# Altium PCB CW341_KintexUSTarget.PcbDoc (part 5 of 7)
Units mil, origin at the board's own origin, x right, y up, seen from the top; angles counter-clockwise.
Board outline 4566.97 x 5485 mil, 6 copper layers (Top Layer, Layer 2 (GND), Layer 3 (sig), Layer 4 (sig), Layer 5 (PWR), Bottom Layer), stack 61.068 mil thick; 157 components, 262 nets, 1869 pads, 1478 vias.
Unrouted connection lines stored in the file: 128.
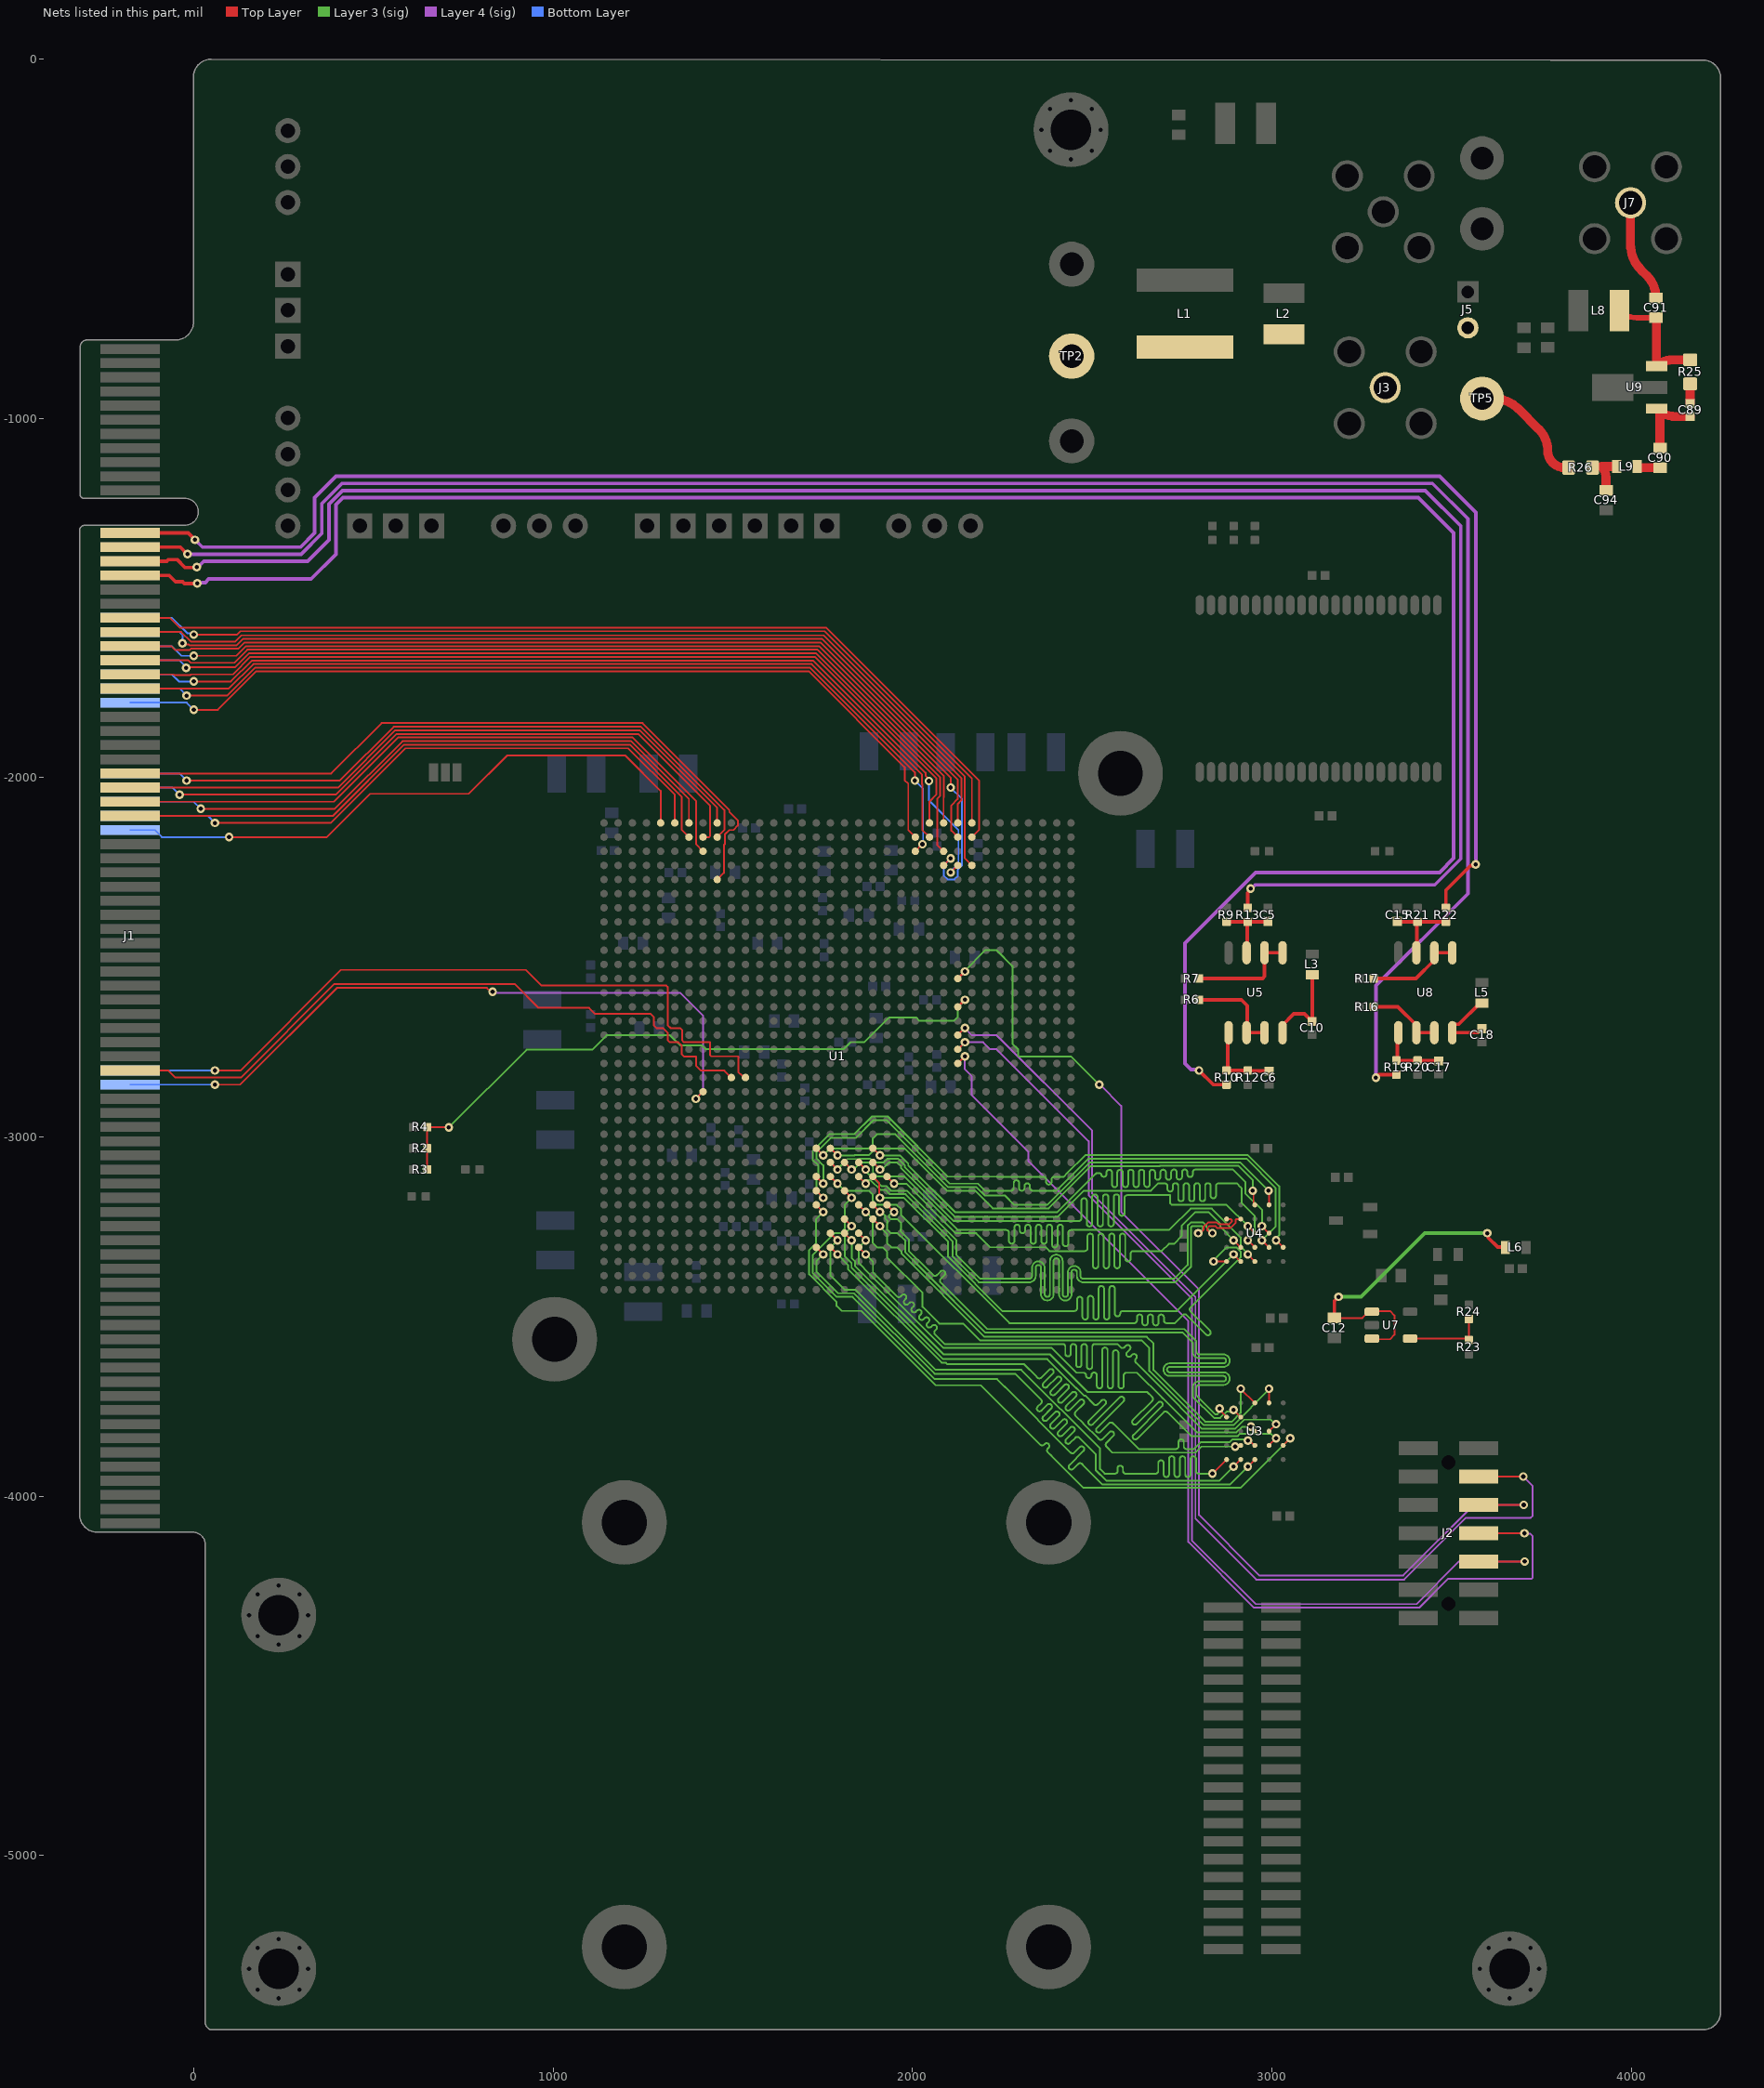
[diagram p8: the nets of this part, all layers, seen from the top]

## Via types
v1: diameter 24, hole 12, Top Layer to Bottom Layer, tented both sides, 1463 vias
v2: diameter 24, hole 10, Top Layer to Bottom Layer, tented both sides, 15 vias

## Nets (pads, with @x,y where several pads share a name; then routed paths per layer and width w, separated by ;. In a path a pad name is that pad's centre, name@x,y a point inside that pad or via, vN(x,y) a via of type N, cw(c..) or ccw(c..) an arc to the next point about the centre after c; other vN are vias at no path point) (continued)
HYPR_1_C\S\: U1.F15 U3.A3 | length 1452
  Top Layer w5: U1.F15@1889.76,-3228.35 v1(1909.45,-3248.03) ; v1(2913.39,-3700.79) U3.A3@2952.76,-3740.16
  Layer 3 (sig) w5: v1(1909.45,-3248.03) 1909.45,-3250.38 1928.95,-3269.88 1928.95,-3295.11 1941.11,-3307.27 1956.9,-3307.27 1969.9,-3320.28 1969.9,-3324.98 2200.93,-3556 2652,-3556 2670.54,-3574.54 2670.54,-3648.46 2814.17,-3792.08 2889.04,-3792.08 2913.39,-3767.73 v1(2913.39,-3700.79)
HYPR_1_DQ0: U1.F17 U3.D3 | length 1915.4
  Top Layer w5: U1.F17@1811.02,-3228.35 v1(1830.71,-3248.03) ; v1(2933.35,-3845.15) 2937.27,-3845.15 2950.38,-3858.27 U3.D3@2952.76,-3858.27
  Layer 3 (sig) w5: v1(1830.71,-3248.03) 1830.71,-3250.38 1811.21,-3269.88 1811.21,-3331.85 1830.58,-3351.22 1830.58,-3363.66 2084.92,-3618 2375.09,-3618 2455.54,-3698.46 2457.31,-3700.22 2477.09,-3720 2481.14,-3720 2504.86,-3743.72 ccw(c2510.16,-3738.41) 2515.47,-3743.72 2525.95,-3733.24 cw(c2531.25,-3738.54) 2536.56,-3733.24 cw(c2531.25,-3738.54) 2536.56,-3743.84 2491.57,-3788.83 ccw(c2496.88,-3794.13) 2491.57,-3799.43 ccw(c2496.88,-3794.13) 2502.18,-3799.43 2576.59,-3725.02 cw(c2581.9,-3730.32) 2587.2,-3725.02 cw(c2581.9,-3730.32) 2587.2,-3735.63 2512.79,-3810.04 ccw(c2518.09,-3815.34) 2512.79,-3820.65 ccw(c2518.09,-3815.34) 2523.39,-3820.65 2547.29,-3796.75 cw(c2552.59,-3802.05) 2557.89,-3796.75 2559.66,-3798.52 2629.67,-3868.52 2730,-3868.52 2732.5,-3868.52 ccw(c2732.5,-3861.02) 2740,-3861.02 2740,-3848.9 cw(c2747.5,-3848.9) 2755,-3848.9 2755,-3861.02 ccw(c2762.5,-3861.02) 2762.5,-3868.52 2777.36,-3868.52 2783.1,-3868.52 2802.1,-3849.53 2882.38,-3849.53 2889.83,-3842.08 2930.28,-3842.08 v1(2933.35,-3845.15)
HYPR_1_DQ1: U1.D18 U3.D2 | length 1910.2
  Top Layer w5: U1.D18@1771.65,-3307.09 v1(1791.34,-3326.77) ; v1(2897.9,-3861.58) 2899.56,-3859.93 2911.73,-3859.93 U3.D2@2913.39,-3858.27
  Layer 3 (sig) w5: v1(1791.34,-3326.77) 1820.58,-3356.01 1820.58,-3367.8 2080.77,-3628 2092.57,-3628 2096.17,-3631.61 2309.61,-3631.61 2346,-3668 2347.77,-3669.77 ccw(c2353.07,-3664.46) 2358.37,-3669.77 2380.24,-3647.9 cw(c2385.54,-3653.2) 2390.85,-3647.9 cw(c2385.54,-3653.2) 2390.85,-3658.51 2364.55,-3684.8 ccw(c2369.86,-3690.11) 2364.55,-3695.41 ccw(c2369.86,-3690.11) 2375.16,-3695.41 2401.45,-3669.11 cw(c2406.76,-3674.42) 2412.06,-3669.11 cw(c2406.76,-3674.42) 2412.06,-3679.72 2385.77,-3706.02 ccw(c2391.07,-3711.32) 2385.77,-3716.62 ccw(c2391.07,-3711.32) 2396.37,-3716.62 2422.67,-3690.33 cw(c2427.97,-3695.63) 2433.27,-3690.33 cw(c2427.97,-3695.63) 2433.27,-3700.93 2406.98,-3727.23 ccw(c2412.28,-3732.53) 2406.98,-3737.84 ccw(c2412.28,-3732.53) 2417.59,-3737.84 2443.88,-3711.54 cw(c2449.18,-3716.84) 2454.49,-3711.54 cw(c2449.18,-3716.84) 2454.49,-3722.15 2428.19,-3748.44 ccw(c2433.5,-3753.75) 2428.19,-3759.05 ccw(c2433.5,-3753.75) 2438.8,-3759.05 2465.1,-3732.74 cw(c2470.41,-3738.05) 2475.71,-3732.74 cw(c2470.41,-3738.05) 2475.71,-3743.35 2453.83,-3765.23 ccw(c2459.14,-3770.53) 2453.83,-3775.83 2475.23,-3797.23 2477,-3799 2516.76,-3838.76 2518.53,-3840.53 ccw(c2523.83,-3835.23) 2529.14,-3840.53 2548.36,-3821.31 cw(c2553.66,-3826.61) 2558.96,-3821.31 cw(c2553.66,-3826.61) 2558.96,-3831.91 2539.74,-3851.14 ccw(c2545.05,-3856.44) 2539.74,-3861.74 2556.52,-3878.52 2606.98,-3878.52 2787.24,-3878.52 2804.18,-3861.58 v1(2897.9,-3861.58)
HYPR_1_DQ2: U1.D16 U3.C4 | length 1916.7
  Top Layer w5: U1.D16@1850.39,-3307.09 v1(1870.08,-3326.77) ; U3.C4@2992.13,-3818.9 v1(3011.81,-3799.21)
  Layer 3 (sig) w5: v1(1870.08,-3326.77) 1889.95,-3346.64 1889.95,-3376.72 1925.63,-3412.4 1927.4,-3414.17 1956.72,-3443.49 ccw(c1962.02,-3438.18) 1967.33,-3443.49 1970.4,-3440.42 cw(c1975.7,-3445.72) 1981,-3440.42 cw(c1975.7,-3445.72) 1981,-3451.02 1977.93,-3454.09 ccw(c1983.23,-3459.4) 1977.93,-3464.7 ccw(c1983.23,-3459.4) 1988.54,-3464.7 1991.61,-3461.63 cw(c1996.91,-3466.93) 2002.22,-3461.63 cw(c1996.91,-3466.93) 2002.22,-3472.24 1999.14,-3475.31 ccw(c2004.45,-3480.61) 1999.14,-3485.91 ccw(c2004.45,-3480.61) 2009.75,-3485.91 2012.82,-3482.84 cw(c2018.13,-3488.15) 2023.43,-3482.84 cw(c2018.13,-3488.15) 2023.43,-3493.45 2020.36,-3496.52 ccw(c2025.66,-3501.82) 2020.36,-3507.13 ccw(c2025.66,-3501.82) 2030.96,-3507.13 2034.04,-3504.06 cw(c2039.34,-3509.36) 2044.64,-3504.06 cw(c2039.34,-3509.36) 2044.64,-3514.66 2041.57,-3517.73 ccw(c2046.87,-3523.04) 2041.57,-3528.34 ccw(c2046.87,-3523.04) 2052.18,-3528.34 2055.25,-3525.27 cw(c2060.55,-3530.57) 2065.86,-3525.27 cw(c2060.55,-3530.57) 2065.86,-3535.88 2062.78,-3538.95 ccw(c2068.09,-3544.25) 2062.78,-3549.55 2073.39,-3560.16 2075.16,-3561.93 2089.23,-3576 2358.84,-3576 2417.78,-3576 cw(c2417.78,-3583.5) 2425.28,-3583.5 2425.28,-3603.16 ccw(c2432.78,-3603.16) 2440.28,-3603.16 2440.28,-3583.5 cw(c2447.78,-3583.5) 2455.28,-3583.5 2455.28,-3633.16 ccw(c2462.78,-3633.16) 2470.28,-3633.16 2470.28,-3583.5 cw(c2477.78,-3583.5) 2485.28,-3583.5 2485.28,-3638.5 ccw(c2492.78,-3638.5) 2500.28,-3638.5 2500.28,-3583.5 cw(c2507.78,-3583.5) 2507.78,-3576 2569.8,-3576 2570.28,-3576.48 2577.4,-3583.6 2579.17,-3585.37 ccw(c2584.47,-3580.06) 2589.78,-3585.37 2593.84,-3581.3 cw(c2599.14,-3586.61) 2604.45,-3581.3 cw(c2599.14,-3586.61) 2604.45,-3591.91 2597.27,-3599.08 ccw(c2602.58,-3604.39) 2597.27,-3609.69 ccw(c2602.58,-3604.39) 2607.88,-3609.69 2611.45,-3606.12 cw(c2616.76,-3611.42) 2622.06,-3606.12 cw(c2616.76,-3611.42) 2622.06,-3616.72 2621.6,-3617.19 ccw(c2626.9,-3622.49) 2621.6,-3627.79 2682.22,-3688.41 2683.99,-3690.18 2805.89,-3812.08 2897.32,-3812.08 2922.75,-3786.66 2996.79,-3786.66 3009.35,-3799.21 v1(3011.81,-3799.21)
HYPR_1_DQ3: U1.E17 U3.D4 | length 1916.7
  Top Layer w5: U1.E17@1811.02,-3267.72 v1(1830.71,-3287.4) ; U3.D4@2992.13,-3858.27 v1(3011.81,-3838.58)
  Layer 3 (sig) w5: v1(1830.71,-3287.4) 1830.71,-3337.2 1840.58,-3347.07 1840.58,-3359.52 2086.06,-3605 2382.09,-3605 2486.8,-3709.72 2522.48,-3709.72 2653.02,-3709.72 2667.03,-3723.72 cw(c2661.73,-3729.03) 2667.03,-3734.33 2613.43,-3787.93 ccw(c2618.73,-3793.23) 2613.43,-3798.54 ccw(c2618.73,-3793.23) 2624.03,-3798.54 2683.41,-3739.16 cw(c2688.72,-3744.46) 2694.02,-3739.16 cw(c2688.72,-3744.46) 2694.02,-3749.76 2614.84,-3828.95 ccw(c2620.14,-3834.25) 2614.84,-3839.55 ccw(c2620.14,-3834.25) 2625.44,-3839.55 2698.85,-3766.15 cw(c2704.15,-3771.45) 2709.46,-3766.15 2751.88,-3808.58 2753.65,-3810.34 2775.39,-3832.08 2905.61,-3832.08 2912.04,-3825.65 2933.63,-3825.65 2997.16,-3825.66 3010.09,-3838.58 v1(3011.81,-3838.58)
HYPR_1_DQ4: U1.G19 U3.D5 | length 1916.7
  Top Layer w5: U1.G19@1732.28,-3188.98 v1(1751.97,-3208.66) ; U3.D5@3031.5,-3858.27 v1(3051.18,-3838.58)
  Layer 3 (sig) w5: v1(1751.97,-3208.66) 1732.1,-3228.53 1732.1,-3255.35 1732.1,-3295.48 1712.47,-3315.11 1712.47,-3382.5 1788.99,-3459.02 1788.99,-3470.11 1802.95,-3484.07 1858.1,-3484.07 2065.03,-3691 2190.09,-3691 2211.54,-3712.46 2213.31,-3714.22 2355.42,-3856.34 ccw(c2360.73,-3851.03) 2366.03,-3856.34 2367.91,-3854.46 cw(c2373.21,-3859.76) 2378.51,-3854.46 cw(c2373.21,-3859.76) 2378.51,-3865.07 2376.64,-3866.94 ccw(c2381.94,-3872.25) 2376.64,-3877.55 2387.24,-3888.16 2389.01,-3889.92 2475.6,-3976.51 2913.26,-3976.51 v1(3051.18,-3838.58)
HYPR_1_DQ5: U1.H17 U3.E3 | length 1915
  Top Layer w5: U1.H17@1811.02,-3149.61 v1(1830.71,-3169.29) ; v1(2933.07,-3917.32) U3.E3@2952.76,-3897.64
  Layer 3 (sig) w5: v1(1830.71,-3169.29) 1811.21,-3188.79 1811.21,-3255.74 1799.05,-3267.9 1783.26,-3267.9 1722.47,-3328.69 1722.47,-3378.36 1789.12,-3445.01 1833.19,-3445.01 2061.99,-3673.82 2235.4,-3673.82 2256.29,-3694.71 2258.06,-3696.48 2439.8,-3878.22 ccw(c2445.11,-3872.92) 2450.41,-3878.22 2465.44,-3863.19 cw(c2470.74,-3868.49) 2476.05,-3863.19 cw(c2470.74,-3868.49) 2476.05,-3873.8 2436.84,-3913 ccw(c2442.14,-3918.31) 2436.84,-3923.61 ccw(c2442.14,-3918.31) 2447.45,-3923.61 2461.01,-3910.04 cw(c2466.32,-3915.34) 2471.62,-3910.04 2473.39,-3911.81 2528.09,-3966.51 2883.89,-3966.51 v1(2933.07,-3917.32)
HYPR_1_DQ6: U1.D19 U3.E2 | length 1916.7
  Top Layer w5: U1.D19@1732.28,-3307.09 v1(1751.97,-3326.77) ; v1(2893.7,-3917.32) U3.E2@2913.39,-3897.64
  Layer 3 (sig) w5: v1(1751.97,-3326.77) 1732.47,-3346.27 1732.47,-3374.22 1793.26,-3435.01 1837.33,-3435.01 2061.57,-3659.25 2286.25,-3659.25 2305,-3678 2306.77,-3679.77 2357.75,-3730.75 cw(c2352.45,-3736.05) 2357.75,-3741.36 2348.3,-3750.81 ccw(c2353.6,-3756.11) 2348.3,-3761.41 ccw(c2353.6,-3756.11) 2358.9,-3761.41 2375.28,-3745.03 cw(c2380.59,-3750.34) 2385.89,-3745.03 cw(c2380.59,-3750.34) 2385.89,-3755.64 2363.93,-3777.6 ccw(c2369.23,-3782.9) 2363.93,-3788.21 ccw(c2369.23,-3782.9) 2374.54,-3788.21 2396.5,-3766.25 cw(c2401.8,-3771.55) 2407.1,-3766.25 cw(c2401.8,-3771.55) 2407.1,-3776.85 2385.14,-3798.81 ccw(c2390.45,-3804.12) 2385.14,-3809.42 ccw(c2390.45,-3804.12) 2395.75,-3809.42 2417.71,-3787.46 cw(c2423.01,-3792.76) 2428.32,-3787.46 cw(c2423.01,-3792.76) 2428.32,-3798.07 2406.36,-3820.03 ccw(c2411.66,-3825.33) 2406.36,-3830.63 ccw(c2411.66,-3825.33) 2416.96,-3830.63 2438.92,-3808.67 cw(c2444.23,-3813.98) 2449.53,-3808.67 cw(c2444.23,-3813.98) 2449.53,-3819.28 2427.57,-3841.24 ccw(c2432.87,-3846.54) 2427.57,-3851.85 ccw(c2432.87,-3846.54) 2438.18,-3851.85 2453.21,-3836.81 cw(c2458.51,-3842.12) 2463.81,-3836.81 2465.58,-3838.58 2509.55,-3882.55 2509.55,-3926.97 2539.09,-3956.51 2854.52,-3956.51 v1(2893.7,-3917.32)
HYPR_1_DQ7: U1.E18 U3.E1 | length 1916.7
  Top Layer w5: U1.E18@1771.65,-3267.72 v1(1791.34,-3287.4) ; v1(2834.65,-3937.01) U3.E1@2874.02,-3897.64
  Layer 3 (sig) w5: v1(1791.34,-3287.4) 1771.84,-3306.9 1771.84,-3386.01 1810.84,-3425.01 1841.47,-3425.01 2064.46,-3648 2303,-3648 2522.09,-3867.09 2522.09,-3924 2535.1,-3937.01 2545,-3937.01 2563.17,-3937.01 ccw(c2563.17,-3929.51) 2570.67,-3929.51 2570.67,-3922.17 cw(c2578.17,-3922.17) 2585.67,-3922.17 2585.67,-3929.51 ccw(c2593.17,-3929.51) 2593.17,-3937.01 2610.67,-3937.01 2617,-3937.01 2676.48,-3937.01 ccw(c2676.48,-3929.51) 2683.98,-3929.51 2683.98,-3907.56 cw(c2691.48,-3907.56) 2698.98,-3907.56 2698.98,-3939.01 ccw(c2706.48,-3939.01) 2713.98,-3939.01 2713.98,-3896.02 cw(c2721.48,-3896.02) 2728.98,-3896.02 2728.98,-3939.01 ccw(c2736.48,-3939.01) 2743.98,-3939.01 2743.98,-3896.02 cw(c2751.48,-3896.02) 2758.98,-3896.02 2758.98,-3939.01 ccw(c2766.48,-3939.01) 2773.98,-3939.01 2773.98,-3896.02 cw(c2781.48,-3896.02) 2788.98,-3896.02 2788.98,-3929.51 ccw(c2796.48,-3929.51) 2796.48,-3937.01 2813.98,-3937.01 v1(2834.65,-3937.01)
HYPR_1_N: U1.G14 U3.B1 | length 1903.3
  Top Layer w5: U1.G14@1929.13,-3188.98 v1(1948.82,-3208.66) ; v1(2854.33,-3755.48) 2854.33,-3759.84 U3.B1@2874.02,-3779.53
  Layer 3 (sig) w5: v1(1948.82,-3208.66) 1944.11,-3208.66 1934.13,-3218.64 1934.13,-3222.78 1939.88,-3228.53 1956.9,-3228.53 1968.32,-3239.95 1968.32,-3256.11 1966.75,-3257.68 1966.75,-3261.82 1989.9,-3284.97 1989.9,-3316.69 2038.38,-3365.17 2040.14,-3366.93 2057.52,-3384.31 ccw(c2062.82,-3379) 2068.12,-3384.31 2078.59,-3373.84 cw(c2083.89,-3379.14) 2089.2,-3373.84 cw(c2083.89,-3379.14) 2089.2,-3384.44 2078.73,-3394.91 ccw(c2084.03,-3400.22) 2078.73,-3405.52 2089.34,-3416.13 2091.1,-3417.89 2207.65,-3534.44 2645.09,-3534.44 2741.16,-3534.44 2756.53,-3534.44 2790.02,-3567.93 2790.02,-3590 2790.02,-3597.5 ccw(c2797.52,-3597.5) 2797.52,-3605 2865.2,-3605 cw(c2865.2,-3622.5) 2865.2,-3640 2715.8,-3640 ccw(c2715.8,-3647.5) 2715.8,-3655 2865.2,-3655 cw(c2865.2,-3672.5) 2865.2,-3690 2797.52,-3690 ccw(c2797.52,-3697.5) 2790.02,-3697.5 2790.02,-3718.75 2794.27,-3723 2843.35,-3772.08 2847.5,-3772.08 2850.7,-3768.88 2850.7,-3759.12 v1(2854.33,-3755.48)
HYPR_1_P: U1.G15 U3.B2 | length 1905.3
  Top Layer w5: U1.G15@1889.76,-3188.98 v1(1909.45,-3208.66) ; v1(2893.7,-3759.84) U3.B2@2913.39,-3779.53
  Layer 3 (sig) w5: v1(1909.45,-3208.66) 1914.15,-3208.66 1924.13,-3218.64 1924.13,-3226.93 1931.17,-3233.96 1931.17,-3238.1 1929.32,-3239.95 1929.32,-3256.11 1940.74,-3267.53 1958.32,-3267.53 1979.9,-3289.12 1979.9,-3320.84 2031.31,-3372.24 2203.51,-3544.44 2677.17,-3544.44 2736.22,-3544.44 2752.39,-3544.44 2780.02,-3572.07 2780.02,-3590 2780.02,-3597.5 ccw(c2797.52,-3597.5) 2797.52,-3615 2865.2,-3615 cw(c2865.2,-3622.5) 2865.2,-3630 2715.8,-3630 ccw(c2715.8,-3647.5) 2715.8,-3665 2865.2,-3665 cw(c2865.2,-3672.5) 2865.2,-3680 2797.52,-3680 ccw(c2797.52,-3697.5) 2780.02,-3697.5 2780.02,-3722.89 2780.13,-3723 2839.21,-3782.08 2856.32,-3782.08 2874.92,-3763.48 2890.07,-3763.48 v1(2893.7,-3759.84)
HYPR_1_R\E\S\E\T\: U1.G16 U3.A4 | length 1587.4
  Top Layer w5: U1.G16@1850.39,-3188.98 v1(1870.08,-3208.66) ; U3.A4@2992.13,-3740.16 v1(2992.13,-3700.79)
  Layer 3 (sig) w5: v1(1870.08,-3208.66) 1889.58,-3228.16 1889.58,-3295.11 1901.56,-3307.09 1917.34,-3307.09 1929.32,-3319.06 1929.32,-3334.85 2027.74,-3433.27 2027.74,-3472.64 2074.37,-3519.27 2141.22,-3519.27 2187.95,-3566 2638,-3566 2658.97,-3586.97 2658.97,-3651.03 2810.03,-3802.08 2893.18,-3802.08 2992.13,-3703.14 v1(2992.13,-3700.79)
HYPR_1_RWDS: U1.E16 U3.C3 | length 1917.1
  Top Layer w5: U1.E16@1850.39,-3267.72 v1(1870.08,-3287.4) ; v1(2941.71,-3806.16) 2941.71,-3807 2952.76,-3818.05 U3.C3@2952.76,-3818.9
  Layer 3 (sig) w5: v1(1870.08,-3287.4) 1850.58,-3306.9 1850.58,-3351.49 1879.95,-3380.86 2086.09,-3587 2387.48,-3587 2456.48,-3656 2475.5,-3656 cw(c2475.5,-3663.5) 2483,-3663.5 2483,-3663.69 ccw(c2490.5,-3663.69) 2498,-3663.69 2498,-3663.18 cw(c2505.5,-3663.18) 2513,-3663.18 2513,-3692.22 ccw(c2520.5,-3692.22) 2528,-3692.22 2528,-3593.5 cw(c2535.5,-3593.5) 2543,-3593.5 2543,-3692.22 ccw(c2550.5,-3692.22) 2558,-3692.22 2558,-3600.84 cw(c2565.5,-3600.84) 2573,-3600.84 2573,-3692.22 ccw(c2580.5,-3692.22) 2588,-3692.22 2588,-3663.5 cw(c2595.5,-3663.5) 2595.5,-3656 2598,-3656 2607.34,-3656 2613,-3656 2625,-3656 2695,-3726 2791.09,-3822.08 2901.46,-3822.08 2917.39,-3806.16 v1(2941.71,-3806.16)
HYPR_2_C\S\: U1.L18 U4.A3 | length 1397.5
  Top Layer w5: U1.L18@1771.65,-3031.5 v1(1791.34,-3051.18) ; v1(2946.81,-3149.61) 2949.1,-3151.89 2949.1,-3182.94 2952.76,-3186.6 U4.A3@2952.76,-3188.98
  Layer 3 (sig) w5: v1(1791.34,-3051.18) 1838.66,-3051.18 1839.27,-3050.57 1877.82,-3050.57 1896.7,-3031.68 1977.43,-3031.68 2095.54,-3149.79 2174.28,-3149.79 2223.28,-3198.79 2379.15,-3198.79 2496.95,-3081 2688.37,-3081 2688.83,-3080.54 2907.6,-3080.54 2943.33,-3116.27 2946.81,-3119.75 v1(2946.81,-3149.61)
HYPR_2_DQ0: U1.K18 U4.D3 | length 1852.8
  Top Layer w5: U1.K18@1771.65,-3070.87 v1(1791.34,-3090.55) ; v1(2933.07,-3287.4) U4.D3@2952.76,-3307.09
  Layer 3 (sig) w5: v1(1791.34,-3090.55) 1791.34,-3089.06 1819.22,-3061.18 1851.05,-3061.18 1851.66,-3060.57 1881.81,-3060.57 1891.93,-3070.68 1920.32,-3070.68 1929.95,-3061.05 1961.04,-3061.05 1978.32,-3078.33 1978.32,-3083.03 2117.45,-3222.16 2404.07,-3222.16 2476.62,-3149.61 2663.87,-3149.61 2684.48,-3129 2701.98,-3129 cw(c2701.98,-3136.5) 2709.48,-3136.5 2709.48,-3144.5 ccw(c2716.98,-3144.5) 2724.48,-3144.5 2724.48,-3135.94 cw(c2731.98,-3135.94) 2739.48,-3135.94 2739.48,-3171.48 ccw(c2746.98,-3171.48) 2754.48,-3171.48 2754.48,-3135.94 cw(c2761.98,-3135.94) 2769.48,-3135.94 2769.48,-3171.48 ccw(c2776.98,-3171.48) 2784.48,-3171.48 2784.48,-3135.94 cw(c2791.98,-3135.94) 2799.48,-3135.94 2799.48,-3171.48 ccw(c2806.98,-3171.48) 2814.48,-3171.48 2814.48,-3135.94 cw(c2821.98,-3135.94) 2829.48,-3135.94 2829.48,-3163.24 ccw(c2836.98,-3163.24) 2844.48,-3163.24 2844.48,-3136.5 cw(c2851.98,-3136.5) 2851.98,-3129 2902.09,-3129 2913.11,-3140.02 2916.09,-3143 2916.09,-3183.5 2952.57,-3219.99 2952.57,-3267.9 v1(2933.07,-3287.4)
HYPR_2_DQ1: U1.J14 U4.D2 | length 1852.9
  Top Layer w5: U1.J14@1929.13,-3110.24 v1(1948.82,-3129.92) ; v1(2893.7,-3287.4) U4.D2@2913.39,-3307.09
  Layer 3 (sig) w5: v1(1948.82,-3129.92) 1982.78,-3129.92 2120.76,-3267.9 2177.33,-3267.9 2216.33,-3306.9 2370.76,-3306.9 2381.26,-3317.4 2477.05,-3317.4 2479.55,-3317.4 ccw(c2479.55,-3309.9) 2487.05,-3309.9 2487.05,-3276.48 cw(c2494.55,-3276.48) 2502.05,-3276.48 2502.05,-3358.01 ccw(c2509.55,-3358.01) 2517.05,-3358.01 2517.05,-3276.48 cw(c2524.55,-3276.48) 2532.05,-3276.48 2532.05,-3358.01 ccw(c2539.55,-3358.01) 2547.05,-3358.01 2547.05,-3276.48 cw(c2554.55,-3276.48) 2562.05,-3276.48 2562.05,-3358.01 ccw(c2569.55,-3358.01) 2577.05,-3358.01 2577.05,-3276.48 cw(c2584.55,-3276.48) 2592.05,-3276.48 2592.05,-3338.89 ccw(c2599.55,-3338.89) 2607.05,-3338.89 2607.05,-3324.9 cw(c2614.55,-3324.9) 2614.55,-3317.4 2667.09,-3317.4 2693.28,-3317.4 2713.37,-3297.31 2727.32,-3297.31 2749.78,-3274.85 2749.78,-3246.45 2787.2,-3209.03 2823.22,-3209.03 2856.64,-3242.45 2856.64,-3250.34 v1(2893.7,-3287.4)
HYPR_2_DQ2: U1.L15 U4.C4 | length 1855.3
  Top Layer w5: U1.L15@1889.76,-3031.5 v1(1909.45,-3051.18) ; v1(2972.44,-3248.03) U4.C4@2992.13,-3267.72
  Layer 3 (sig) w5: v1(1909.45,-3051.18) 1909.58,-3051.05 1965.18,-3051.05 1988.32,-3074.19 1988.32,-3078.89 2118.22,-3208.79 2403.3,-3208.79 2503.77,-3108.32 2510.02,-3102.07 cw(c2516.8,-3112.93) 2525.02,-3103.11 ccw(c2532.52,-3103.11) 2540.02,-3103.11 2540.02,-3098.5 cw(c2547.52,-3098.5) 2555.02,-3098.5 2555.02,-3132.11 ccw(c2562.52,-3132.11) 2570.02,-3132.11 2570.02,-3098.5 cw(c2577.52,-3098.5) 2585.02,-3098.5 2585.02,-3132.11 ccw(c2592.52,-3132.11) 2600.02,-3132.11 2600.02,-3098.5 cw(c2607.52,-3098.5) 2615.02,-3098.5 2615.02,-3132.11 ccw(c2622.52,-3132.11) 2630.02,-3132.11 2630.02,-3098.5 cw(c2637.52,-3098.5) 2645.02,-3098.5 2645.02,-3131.82 ccw(c2652.52,-3131.82) 2660.02,-3131.82 2660.02,-3098.5 cw(c2667.52,-3098.5) 2675.02,-3098.5 2675.02,-3111.5 ccw(c2682.52,-3111.5) 2690.02,-3111.5 2690.02,-3098.36 cw(c2697.52,-3098.36) 2705.02,-3098.36 2705.02,-3111.5 ccw(c2712.52,-3111.5) 2720.02,-3111.5 2720.02,-3098.04 cw(c2727.52,-3098.04) 2735.02,-3098.04 2735.02,-3110.94 ccw(c2742.52,-3110.94) 2750.02,-3110.94 2750.02,-3098.04 cw(c2757.52,-3098.04) 2765.02,-3098.04 2765.02,-3103.96 ccw(c2772.52,-3103.96) 2780.02,-3103.96 2780.02,-3098.04 cw(c2787.52,-3098.04) 2787.52,-3090.54 2891.63,-3090.54 2917.43,-3116.34 2926.09,-3125 2926.09,-3156.46 2972.44,-3202.81 v1(2972.44,-3248.03)
HYPR_2_DQ3: U1.J19 U4.D4 | length 1852.9
  Top Layer w5: U1.J19@1732.28,-3110.24 v1(1751.97,-3129.92) ; v1(2972.44,-3287.4) U4.D4@2992.13,-3307.09
  Layer 3 (sig) w5: v1(1751.97,-3129.92) 1751.97,-3078.76 1732.47,-3059.26 1732.47,-3043.1 1773.63,-3001.94 1842.93,-3001.94 1891.93,-2952.94 1926.97,-2952.94 2103.82,-3129.79 2182.56,-3129.79 2202.19,-3149.42 2271.78,-3149.42 2274.28,-3149.42 ccw(c2274.28,-3141.92) 2281.78,-3141.92 2281.78,-3127.97 cw(c2289.28,-3127.97) 2296.78,-3127.97 2296.78,-3142.29 ccw(c2304.28,-3142.29) 2311.78,-3142.29 2311.78,-3136.45 cw(c2319.28,-3136.45) 2326.78,-3136.45 2326.78,-3141.92 ccw(c2334.28,-3141.92) 2334.28,-3149.42 2371.54,-3149.42 2400.24,-3149.42 2488.66,-3061 2680.09,-3061 2680.55,-3060.54 2929.32,-3060.54 3010.31,-3141.53 3010.31,-3249.53 v1(2972.44,-3287.4)
HYPR_2_DQ4: U1.H19 U4.D5 | length 1855.3
  Top Layer w5: U1.H19@1732.28,-3149.61 v1(1751.97,-3169.29) ; v1(3011.81,-3287.4) U4.D5@3031.5,-3307.09
  Layer 3 (sig) w5: v1(1751.97,-3169.29) 1732.47,-3149.79 1732.47,-3114.25 1737.69,-3109.03 1737.69,-3078.62 1722.47,-3063.4 1722.47,-3038.96 1769.49,-2991.94 1838.79,-2991.94 1887.79,-2942.94 1931.11,-2942.94 2098.59,-3110.42 2234.57,-3110.42 2234.62,-3110.47 2347,-3110.47 2364.5,-3110.47 cw(c2364.5,-3117.97) 2372,-3117.97 2372,-3125.12 ccw(c2379.5,-3125.12) 2387,-3125.12 2387,-3117.97 cw(c2394.5,-3117.97) 2394.5,-3110.47 2411.96,-3110.47 2421.03,-3110.47 2430.85,-3100.65 2480.96,-3050.54 2933.46,-3050.54 3020.31,-3137.39 3020.31,-3273.76 3011.81,-3282.26 v1(3011.81,-3287.4)
HYPR_2_DQ5: U1.K17 U4.E3 | length 1851.9
  Top Layer w5: U1.K17@1811.02,-3070.87 v1(1830.71,-3090.55) ; v1(2933.07,-3326.77) U4.E3@2952.76,-3346.46
  Layer 3 (sig) w5: v1(1830.71,-3090.55) 1835.82,-3090.55 1855.32,-3071.05 1878.16,-3071.05 1889.58,-3082.47 1889.95,-3082.84 1889.95,-3098.63 1901.61,-3110.29 1977.3,-3110.29 2124.91,-3257.9 2214.51,-3257.9 2215.58,-3258.98 2243.63,-3258.98 2261.13,-3258.98 cw(c2261.13,-3266.48) 2268.63,-3266.48 2268.63,-3289.4 ccw(c2276.13,-3289.4) 2283.63,-3289.4 2283.63,-3251.54 cw(c2291.13,-3251.54) 2298.63,-3251.54 2298.63,-3260.4 ccw(c2306.13,-3260.4) 2313.63,-3260.4 2313.63,-3251.54 cw(c2321.13,-3251.54) 2328.63,-3251.54 2328.63,-3289.4 ccw(c2336.13,-3289.4) 2343.63,-3289.4 2343.63,-3251.54 cw(c2351.13,-3251.54) 2358.63,-3251.54 2358.63,-3289.4 ccw(c2366.13,-3289.4) 2373.63,-3289.4 2373.63,-3251.54 cw(c2381.13,-3251.54) 2388.63,-3251.54 2388.63,-3299.9 ccw(c2396.13,-3299.9) 2403.63,-3299.9 2403.63,-3251.54 cw(c2411.13,-3251.54) 2418.63,-3251.54 2418.63,-3296.73 ccw(c2426.13,-3296.73) 2433.63,-3296.73 2433.63,-3266.48 cw(c2441.13,-3266.48) 2441.13,-3258.98 2714.19,-3258.98 2718.64,-3254.53 2774.13,-3199.03 2832.91,-3199.03 2913.2,-3279.32 2913.2,-3304.55 2933.07,-3324.42 v1(2933.07,-3326.77)
HYPR_2_DQ6: U1.J15 U4.E2 | length 1855.3
  Top Layer w5: U1.J15@1889.76,-3110.24 1907.7,-3128.17 1907.7,-3167.54 v1(1909.45,-3169.29) ; v1(2893.7,-3326.77) U4.E2@2913.39,-3346.46
  Layer 3 (sig) w5: v1(1909.45,-3169.29) 1932.33,-3169.29 1932.46,-3169.42 1976.53,-3169.42 2099.02,-3291.92 2099.02,-3333.34 2249.93,-3484.25 2301.09,-3484.25 2448,-3484.25 2450.5,-3484.25 ccw(c2450.5,-3476.75) 2458,-3476.75 2458,-3452.38 cw(c2465.5,-3452.38) 2473,-3452.38 2473,-3500.5 ccw(c2480.5,-3500.5) 2488,-3500.5 2488,-3449.87 cw(c2495.5,-3449.87) 2503,-3449.87 2503,-3500.5 ccw(c2510.5,-3500.5) 2518,-3500.5 2518,-3421.95 cw(c2525.5,-3421.95) 2533,-3421.95 2533,-3500.5 ccw(c2540.5,-3500.5) 2548,-3500.5 2548,-3422.04 cw(c2555.5,-3422.04) 2563,-3422.04 2563,-3491.75 ccw(c2570.5,-3491.75) 2578,-3491.75 cw(c2585.5,-3491.75) 2585.5,-3484.25 2700,-3484.25 2736.22,-3484.25 v1(2893.7,-3326.77)
HYPR_2_DQ7: U1.J18 U4.E1 | length 1855.3
  Top Layer w5: U1.J18@1771.65,-3110.24 v1(1791.34,-3129.92) ; v1(2837.56,-3346.46) U4.E1@2874.02,-3346.46
  Layer 3 (sig) w5: v1(1791.34,-3129.92) 1811.21,-3149.79 1878.16,-3149.79 1889.76,-3161.4 1889.76,-3177.18 1901.37,-3188.79 1956.53,-3188.79 1968.69,-3200.95 1968.69,-3217.15 2269.54,-3518 2599,-3518 2617.11,-3518 ccw(c2617.11,-3510.5) 2624.61,-3510.5 2624.61,-3501.75 cw(c2632.11,-3501.75) 2639.61,-3501.75 2639.61,-3516.94 ccw(c2647.11,-3516.94) 2654.61,-3516.94 2654.61,-3501.75 cw(c2662.11,-3501.75) 2669.61,-3501.75 2669.61,-3516.94 ccw(c2677.11,-3516.94) 2684.61,-3516.94 2684.61,-3501.75 cw(c2692.11,-3501.75) 2699.61,-3501.75 2699.61,-3510.5 ccw(c2707.11,-3510.5) 2707.11,-3518 2724.61,-3518 2730.05,-3518 2740.02,-3508.02 2752.4,-3495.65 cw(c2757.7,-3500.95) 2763.01,-3495.65 2816.97,-3549.61 ccw(c2822.27,-3544.31) 2827.57,-3549.61 ccw(c2822.27,-3544.31) 2827.57,-3539.01 2773.61,-3485.04 cw(c2778.92,-3479.74) 2773.61,-3474.44 2820.52,-3427.52 2868.57,-3379.48 2913.2,-3334.85 2913.2,-3318.69 2901.78,-3307.27 2873.83,-3307.27 2837.56,-3343.54 v1(2837.56,-3346.46)
HYPR_2_N: U1.J16 U4.B1 | length 1832.3
  Top Layer w5: U1.J16@1850.39,-3110.24 v1(1870.08,-3129.92) ; v1(2795.28,-3267.72) 2800.42,-3267.72 2806.42,-3261.71 2807.03,-3261.71 2809.96,-3258.78 2809.96,-3250.5 2822.43,-3238.03 2846.86,-3238.03 2851.57,-3242.74 2881.38,-3242.74 2888.7,-3235.42 2888.7,-3231.28 2885.77,-3228.35 U4.B1@2874.02,-3228.35
  Layer 3 (sig) w5: v1@1872.37,-3120.42 1883.46,-3120.42 1910.15,-3147.11 1924.29,-3147.11 1936.6,-3159.42 1980.67,-3159.42 2089.46,-3268.21 2092.39,-3271.14 2111.73,-3290.48 2111.73,-3331.91 2138.14,-3358.32 2184.28,-3404.45 2317.66,-3404.45 2325.16,-3404.45 ccw(c2325.16,-3386.95) 2342.66,-3386.95 2342.66,-3363.77 cw(c2350.16,-3363.77) 2357.66,-3363.77 2357.66,-3437.38 ccw(c2375.16,-3437.38) 2392.66,-3437.38 2392.66,-3344.9 cw(c2400.16,-3344.9) 2407.66,-3344.9 2407.66,-3437.66 ccw(c2425.16,-3437.66) 2442.66,-3437.66 2442.66,-3376.51 cw(c2450.16,-3376.51) 2457.66,-3376.51 2457.66,-3386.95 ccw(c2475.16,-3386.95) 2475.16,-3404.45 2578.74,-3404.45 2731.74,-3404.45 2775.59,-3360.6 2775.59,-3250.96 2778.52,-3248.03 2804.96,-3248.03 2807.89,-3250.96 2807.89,-3255.1 v1(2795.28,-3267.72)
HYPR_2_P: U1.K16 U4.B2 | length 1864.2
  Top Layer w5: U1.K16@1850.39,-3070.87 v1(1870.08,-3090.55) ; v1@1863.07,-3097.56 v1@1863.22,-3097.7 ; v1(2834.65,-3267.53) 2829.5,-3267.53 2823.68,-3261.71 2822.89,-3261.71 2819.96,-3258.78 2819.96,-3254.64 2826.57,-3248.03 2842.72,-3248.03 2847.43,-3252.74 2885.52,-3252.74 2898.7,-3239.56 2898.7,-3231.28 2901.63,-3228.35 U4.B2@2913.39,-3228.35
  Layer 3 (sig) w5: v1(1870.08,-3090.55) 1870.08,-3095.69 1883.41,-3109.02 1886.2,-3109.02 1914.29,-3137.11 1928.43,-3137.11 1940.74,-3149.42 1984.81,-3149.42 2099.46,-3264.07 2121.73,-3286.34 2121.73,-3327.76 2135.21,-3341.25 2145.21,-3351.25 2188.42,-3394.45 2317.66,-3394.45 2325.16,-3394.45 ccw(c2325.16,-3386.95) 2332.66,-3386.95 2332.66,-3363.77 cw(c2350.16,-3363.77) 2367.66,-3363.77 2367.66,-3437.38 ccw(c2375.16,-3437.38) 2382.66,-3437.38 2382.66,-3344.9 cw(c2400.16,-3344.9) 2417.66,-3344.9 2417.66,-3437.66 ccw(c2425.16,-3437.66) 2432.66,-3437.66 2432.66,-3376.51 cw(c2450.16,-3376.51) 2467.66,-3376.51 2467.66,-3386.95 ccw(c2475.16,-3386.95) 2475.16,-3394.45 2578.74,-3394.45 2727.59,-3394.45 2765.59,-3356.46 2765.59,-3246.82 2774.38,-3238.03 2809.1,-3238.03 2817.89,-3246.82 2817.89,-3250.96 2834.46,-3267.53 v1(2834.65,-3267.53)
HYPR_2_R\E\S\E\T\: U1.L19 U4.A4 | length 1503.3
  Top Layer w5: U1.L19@1732.28,-3031.5 v1(1751.97,-3051.18) ; v1(2990.81,-3149.61) 2992.13,-3150.92 U4.A4@2992.13,-3188.98
  Layer 3 (sig) w5: v1(1751.97,-3051.18) 1771.47,-3031.68 1877.79,-3031.68 1889.58,-3019.89 1889.58,-3004.1 1901.37,-2992.31 1952.2,-2992.31 2099.68,-3139.79 2178.42,-3139.79 2201.39,-3162.76 2257.62,-3162.76 2283.65,-3188.79 2375.01,-3188.79 2492.8,-3071 2684.23,-3071 2684.69,-3070.54 2911.75,-3070.54 2947.48,-3106.27 v1(2990.81,-3149.61)
HYPR_2_RWDS: U1.K15 U4.C3 | length 1855.3
  Top Layer w5: U1.K15@1889.76,-3070.87 v1(1909.45,-3090.55) ; v1(2933.07,-3248.03) U4.C3@2952.76,-3267.72
  Layer 3 (sig) w5: v1(1909.45,-3090.55) 1914.59,-3090.55 1924.46,-3080.68 1934.09,-3071.05 1956.9,-3071.05 1968.32,-3082.47 1968.32,-3087.17 2115.19,-3234.04 2460.05,-3234.04 2462.55,-3234.04 ccw(c2462.55,-3226.54) 2470.05,-3226.54 2470.05,-3177.82 cw(c2477.55,-3177.82) 2485.05,-3177.82 2485.05,-3241.48 ccw(c2492.55,-3241.48) 2500.05,-3241.48 2500.05,-3167.11 cw(c2507.55,-3167.11) 2515.05,-3167.11 2515.05,-3241.48 ccw(c2522.55,-3241.48) 2530.05,-3241.48 2530.05,-3167.11 cw(c2537.55,-3167.11) 2545.05,-3167.11 2545.05,-3241.48 ccw(c2552.55,-3241.48) 2560.05,-3241.48 2560.05,-3167.11 cw(c2567.55,-3167.11) 2575.05,-3167.11 2575.05,-3212.04 ccw(c2582.55,-3212.04) 2590.05,-3212.04 2590.05,-3169.5 cw(c2597.55,-3169.5) 2597.55,-3162 2705,-3162 2717.13,-3162 2717.13,-3184.36 2717.04,-3184.45 2721.57,-3188.98 2874.02,-3188.98 v1(2933.07,-3248.03)
JTAG_TCK: J2.6 U1.AC9 | length 3213.3
  Top Layer w5: J2.6@3575.28,-4023.94 v1(3701.06,-4023.94)
  Top Layer w8: U1.AC9@2125.98,-2559.06 v1(2145.67,-2539.37)
  Layer 4 (sig) w5: v1(2519.69,-2854.33) 2521.77,-2854.33 2580.83,-2913.39 2580.83,-3208.66 2797.36,-3425.2 2797.36,-4052.36 2965,-4220 3365.86,-4220 3561.92,-4023.94 v1(3701.06,-4023.94)
  Layer 3 (sig) w5: v1(2145.67,-2539.37) 2145.67,-2537.02 2202.19,-2480.5 2234.57,-2480.5 2278.4,-2524.32 2278.4,-2739.93 2293.89,-2755.42 2293.89,-2772.66 2296.82,-2775.59 2440.94,-2775.59 v1(2519.69,-2854.33)
JTAG_TDI: J2.10 U1.V9 | length 2893.3
  Top Layer w5: U1.V9@2125.98,-2755.91 v1(2145.67,-2736.22) ; J2.10@3575.28,-4181.42 v1(3703.58,-4181.42)
  Layer 4 (sig) w5: v1(2145.67,-2736.22) 2196.83,-2736.22 2216.33,-2755.72 2234.2,-2755.72 2490.19,-3011.7 2490.19,-3161.83 2777.36,-3449 2777.36,-4122.36 2955,-4300 3402.56,-4300 3521.14,-4181.42 v1(3703.58,-4181.42)
JTAG_TDO: J2.8 U1.U9 | length 2974.6
  Top Layer w5: U1.U9@2125.98,-2795.28 v1(2145.67,-2775.59) ; J2.8@3575.28,-4102.68 v1(3702.68,-4102.68)
  Layer 4 (sig) w5: v1(2145.67,-2775.59) 2145.67,-2811.25 2165.17,-2830.75 2165.17,-2883.67 2323.02,-3041.52 2323.02,-3068.12 2767.36,-3512.47 2767.36,-4127.36 2950,-4310 3410,-4310 3490,-4230 3722.07,-4230 3725,-4227.07 3725,-4110 3718.96,-4103.96 3703.96,-4103.96 v1(3702.68,-4102.68)
JTAG_TMS: J2.4 U1.W9 | length 3025.3
  Top Layer w5: U1.W9@2125.98,-2716.54 v1(2145.67,-2696.85) ; J2.4@3575.28,-3945.2 v1(3699.8,-3945.2)
  Layer 4 (sig) w5: v1(2145.67,-2696.85) 2165.54,-2716.72 2234.57,-2716.72 2500.19,-2982.33 2500.19,-3157.68 2787.36,-3444.86 2787.36,-4062.36 2956.68,-4231.68 3368.32,-4231.68 3540,-4060 3720,-4060 3725,-4055 3725,-3970.39 v1(3699.8,-3945.2)
NetC5_1: C5.1 R9.1 R13.2 U5.3 | length 202.9
  Top Layer w10: R9.1@2874.02,-2401.57 R13.2@2933.07,-2401.57 ; U5.3@2929.72,-2487.2 2931.4,-2485.53 2931.4,-2403.25 R13.2@2933.07,-2401.57 ; C5.1@2989.2,-2400 2988.42,-2400.79 2933.86,-2400.79 R13.2@2933.07,-2401.57
NetC6_1: C6.1 R10.2 R12.1 U5.5 | length 226.4
  Top Layer w10: U5.5@2879.72,-2709.65 2877.12,-2712.25 2877.12,-2811.86 R10.2@2874.02,-2814.96 R12.1@2933.07,-2814.96 2933.86,-2815.75 2991.34,-2815.75 C6.1@2992.13,-2816.54
NetC10_1: C10.1 L3.1 U5.8 | length 255.3
  Top Layer w10: U5.8@3029.72,-2709.65 3029.72,-2688.98 3061.22,-2657.48 3090.94,-2657.48 C10.1@3112.2,-2678.74 L3.1@3112.2,-2548.43
NetC12_1: C12.1 L6.2 U7.1 U7.3 | length 926.5
  Top Layer w5: C12.1@3174.16,-3503.95 3251.91,-3503.95 3269.63,-3486.23 U7.1@3278.49,-3486.23 3280.45,-3484.26 3328.71,-3484.26 3341.29,-3496.85 3341.29,-3550.42 3328.71,-3563 3280.45,-3563 U7.3@3278.49,-3561.03
  Top Layer w10: C12.1@3174.16,-3503.95 3174.16,-3456.7 v1(3185.97,-3444.89) ; v1(3599.35,-3267.73) 3602.03,-3270.41 3602.03,-3280.26 3628.38,-3306.61 3649.64,-3306.61 L6.2@3650.12,-3307.09
  Layer 3 (sig) w10: v1(3185.97,-3444.89) 3248.02,-3444.89 3425.19,-3267.73 v1(3599.35,-3267.73)
NetC15_1: C15.1 R21.1 R22.2 U8.3 | length 222.5
  Top Layer w10: C15.1@3349.38,-2400 3350.17,-2400.79 3404.72,-2400.79 R21.1@3405.51,-2401.57 ; U8.3@3402.16,-2487.2 3403.84,-2485.53 3403.84,-2403.25 R21.1@3405.51,-2401.57 ; R22.2@3484.25,-2401.57 R21.1@3405.51,-2401.57
NetC17_1: C17.1 R19.2 R20.1 U8.5 | length 198.6
  Top Layer w10: U8.5@3352.16,-2709.65 3349.56,-2712.25 3349.56,-2784.01 R19.2@3346.46,-2787.12 R20.1@3405.51,-2787.12 3406.3,-2787.9 3463.78,-2787.9 C17.1@3464.57,-2788.69
NetC18_1: C18.1 L5.1 U8.8 | length 213.7
  Top Layer w10: C18.1@3584.65,-2698.43 3573.42,-2709.65 U8.8@3502.16,-2709.65 3502.16,-2692.66 3508.46,-2686.37 3519.93,-2686.37 3579.13,-2627.17 L5.1@3584.65,-2627.17
NetC89_1: C89.1 C90.2 U9.1 | length 200.6
  Top Layer w25: U9.1@4071,-973 ccw(c4124.11,-919.89) U9.1@4080,-980.68 ; C90.2@4080,-1082.44 U9.1@4080,-980.68 ; C89.1@4164,-995 4124.11,-995 cw(c4124.11,-919.89) U9.1@4080,-980.68
NetC89_2: C89.2 R25.1 | length 54.8
  Top Layer w25: C89.2@4164,-958.78 R25.1@4164,-904
NetC90_1: C90.1 L9.2 | length 64.2
  Top Layer w25: L9.2@4016.74,-1134 ccw(c4025.33,-1125.41) 4025.33,-1137.56 C90.1@4080,-1137.56
NetC91_1: C91.1 L8.1 R25.2 U9.3 | length 340.7
  Top Layer w15: L8.1@3967.09,-700 ccw(c4015.37,-651.72) 4015.37,-720 C91.1@4069,-720
  Top Layer w25: C91.1@4069,-720 4070,-721 4070,-853.89 U9.3@4071,-854.89 cw(c4114.02,-897.91) 4114.02,-837.07 R25.2@4164,-837.07
NetC91_2: C91.2 J7.1 | length 286.2
  Top Layer w25: J7.1@3998,-400 3998,-515.64 ccw(c4098,-515.64) 4027.29,-586.35 4042.96,-602.01 cw(c3980.09,-664.88) C91.2@4069,-664.88
NetC94_1: C94.1 L9.1 R26.2 | length 111.6
  Top Layer w25: C94.1@3930,-1200.44 3930,-1164.36 ccw(c3887.06,-1164.36) 3917.42,-1134 L9.1@3959.26,-1134
NetJ3_1: J3.1 J5.2 L1.1 L2.1 R26.1 TP2.1 TP5.1 | length 340.4
  Top Layer w25: TP5.1@3584.77,-944.88 3616.06,-944.88 cw(c3616.06,-1044.88) 3686.77,-974.17 3742.66,-1030.06 cw(c3682.17,-1090.55) 3767.72,-1090.55 ccw(c3814.17,-1090.55) 3814.17,-1137 R26.1@3825.54,-1137
NetR2_1: R2.1 R3.1 R4.2 U1.AA9 | length 1846.4
  Top Layer w5: R3.1@649.61,-3090.55 R2.1@649.61,-3031.5 R4.2@649.61,-2972.44 708.66,-2972.44 v1(709.84,-2973.62)
  Top Layer w8: U1.AA9@2125.98,-2637.8 v1(2145.67,-2618.11)
  Layer 3 (sig) w5: v1(709.84,-2973.62) 926.4,-2757.05 1108.39,-2757.05 1148.72,-2716.72 1325.56,-2716.72 1354.3,-2745.46 1414.25,-2745.46 1424.51,-2755.72 1484.46,-2755.72 1484.71,-2755.46 1625.52,-2755.46 1625.78,-2755.72 1807.89,-2755.72 1827.26,-2736.35 1865.7,-2736.35 1934.7,-2667.35 2009.85,-2667.35 2019.48,-2676.98 2114.38,-2676.98 2126.17,-2665.19 2126.17,-2639.96 2145.67,-2620.46 v1(2145.67,-2618.11)
NetR6_1: R6.1 U5.6 U5.7 | length 263.2
  Top Layer w10: R6.1@2797.24,-2618.11 2915.47,-2618.11 2931.82,-2634.45 2931.82,-2707.55 2933.91,-2709.65 U5.7@2979.72,-2709.65
NetR7_1: R7.1 U5.1 U5.2 | length 300.9
  Top Layer w10: R7.1@2797.24,-2559.06 2973.87,-2559.05 2979.72,-2553.2 U5.2@2979.72,-2487.2 U5.1@3029.72,-2487.2
NetR16_1: R16.1 U8.6 U8.7 | length 210.3
  Top Layer w10: R16.1@3283.75,-2637.8 3350.98,-2637.8 3402.16,-2688.98 U8.6@3402.16,-2709.65 U8.7@3452.16,-2709.65
NetR17_1: R17.1 U8.1 U8.2 | length 260.3
  Top Layer w10: R17.1@3283.75,-2559.06 3400.98,-2559.06 3452.16,-2507.87 U8.2@3452.16,-2487.2 U8.1@3502.16,-2487.2
NetR23_1: R23.1 R24.2 U7.4 | length 223.3
  Top Layer w5: U7.4@3384.79,-3561.03 3544.23,-3561.03 R23.1@3548.17,-3564.97 R24.2@3548.17,-3506.65
OT_ADC1: J1.B12 R22.1 | length 5083.3
  Top Layer w10: J1.B12@-177.17,-1318.9 -15.39,-1318.9 v1(3.73,-1338.02) ; R22.1@3484.25,-2362.2 3484.25,-2312.99 3552.79,-2244.46 3564.72,-2244.46 v1(3567.4,-2241.78)
  Layer 4 (sig) w10: v1(3.73,-1338.02) 23.98,-1358.27 297.36,-1358.27 336.73,-1318.9 336.73,-1220.47 395.79,-1161.42 2364.75,-1161.42 3466.65,-1161.42 3567.4,-1262.16 v1(3567.4,-2241.78)
OT_ADC2: J1.B13 R19.1 | length 5623.3
  Top Layer w10: J1.B13@-177.17,-1358.27 -37.28,-1358.27 v1(-17.6,-1377.95) ; v1(3289.49,-2834.65) 3297.65,-2826.49 R19.1@3346.46,-2826.49
  Layer 4 (sig) w10: v1(-17.6,-1377.95) 298.89,-1377.95 356.42,-1320.43 356.42,-1237.1 412.42,-1181.1 3446.97,-1181.1 3545.4,-1279.53 3545.4,-2322.83 3289.49,-2578.74 v1(3289.49,-2834.65)
OT_ANALOG0_ADC3: J1.B14 R13.1 | length 5504.4
  Top Layer w10: J1.B14@-177.17,-1397.64 -74.83,-1397.64 -70.2,-1393.01 -46.38,-1393.01 -24.38,-1415.01 6.76,-1415.01 v1(8.27,-1413.5) ; R13.1@2933.07,-2362.2 2933.07,-2320.45 2940.87,-2312.65 v1(2940.87,-2308.86)
  Layer 4 (sig) w10: v1(8.27,-1413.5) 12.06,-1413.5 27.92,-1397.64 317.05,-1397.64 376.1,-1338.58 376.1,-1238.63 413.95,-1200.79 3427.29,-1200.79 3525.71,-1299.21 3525.71,-2225.94 3453.18,-2298.46 2953.73,-2298.46 2943.33,-2308.86 v1(2940.87,-2308.86)
OT_ANALOG1_ADC4: J1.B15 R10.1 | length 6139.5
  Top Layer w10: J1.B15@-177.17,-1437.01 -68.39,-1437.01 -51.02,-1454.38 -31.34,-1454.38 -26.25,-1459.47 v1(9.87,-1459.47) ; v1(2797.36,-2814.96) 2836.73,-2854.33 R10.1@2874.02,-2854.33
  Layer 4 (sig) w10: v1(9.87,-1459.47) 12.55,-1456.79 32.1,-1456.79 41.87,-1447.02 326.72,-1447.02 395.79,-1377.95 395.79,-1240.16 415.47,-1220.47 3407.6,-1220.47 3506.03,-1318.9 3506.03,-2224.41 3466.66,-2263.78 2954.84,-2263.78 2757.99,-2460.63 2757.99,-2795.28 2775,-2812.28 2794.68,-2812.28 v1(2797.36,-2814.96)
OT_IOA0: J1.A29 U1.AN26 | length 1903.3
  Top Layer w5: v1(-19.69,-2007.87) 406.69,-2007.87 556.37,-1858.19 1244.76,-1858.19 1476.38,-2089.81 1476.38,-2145.54 1456.69,-2165.22 U1.AN26@1456.69,-2165.35
  Bottom Layer w5: J1.A29@-177.17,-1988.19 -39.37,-1988.19 v1(-19.69,-2007.87)
OT_IOA1: J1.B29 U1.AK26 | length 2059.5
  Top Layer w5: J1.B29@-177.17,-1988.19 382.72,-1988.19 522.72,-1848.19 1248.9,-1848.19 1490.39,-2089.67 1490.39,-2094.95 1514,-2118.56 1514,-2133.41 1501.74,-2145.67 1490.39,-2145.67 1478.13,-2157.93 1478.13,-2184.7 1475.06,-2187.77 1475.06,-2265.1 U1.AK26@1456.69,-2283.46
OT_IOA2: J1.A30 U1.AN27 | length 1880
  Top Layer w5: v1(-39.37,-2047.24) 395.6,-2047.24 564.66,-1878.19 1236.47,-1878.19 1437.01,-2078.72 1437.01,-2162.43 1434.08,-2165.35 U1.AN27@1417.32,-2165.35
  Bottom Layer w5: J1.A30@-177.17,-2027.56 -59.06,-2027.56 v1(-39.37,-2047.24)
OT_IOA3: J1.B30 U1.AP26 | length 1831.1
  Top Layer w5: J1.B30@-177.17,-2027.56 401.15,-2027.56 560.52,-1868.19 1240.62,-1868.19 1456.69,-2084.27 U1.AP26@1456.69,-2125.98
OT_IOA4: J1.A31 U1.AP28 | length 1775
  Top Layer w5: v1(19.68,-2086.61) 392.56,-2086.61 580.99,-1898.19 1217.24,-1898.19 1377.95,-2058.9 U1.AP28@1377.95,-2125.98
  Bottom Layer w5: J1.A31@-177.17,-2066.93 0,-2066.93 v1(19.68,-2086.61)
OT_IOA5: J1.B31 U1.AM27 | length 1850.6
  Top Layer w5: J1.B31@-157.48,-2066.93 390.06,-2066.93 568.8,-1888.19 1221.38,-1888.19 1397.64,-2064.44 1397.64,-2185.04 U1.AM27@1417.32,-2204.72
OT_IOA6: J1.A32 U1.AP29 | length 1741.8
  Top Layer w5: v1(59.06,-2125.98) 381.48,-2125.98 589.27,-1918.19 1208.96,-1918.19 1338.58,-2047.81 U1.AP29@1338.58,-2125.98
  Bottom Layer w5: J1.A32@-177.17,-2106.3 0,-2106.3 39.37,-2106.3 v1(59.06,-2125.98)
OT_IOA7: J1.B32 U1.AN28 | length 1797.8
  Top Layer w5: J1.B32@-177.17,-2106.3 387.02,-2106.3 585.13,-1908.19 1213.1,-1908.19 1358.27,-2053.36 1358.27,-2145.67 U1.AN28@1377.95,-2165.35
OT_IOA8: J1.A33 U1.AP30 | length 1716.9
  Top Layer w5: v1(98.43,-2165.35) 370.39,-2165.35 490.8,-2044.94 765,-2044.94 871.75,-1938.19 ; 880,-1938.19 871.75,-1938.19 ; U1.AP30@1299.21,-2125.98 1299.21,-2036.73 1200.67,-1938.19 871.75,-1938.19
  Bottom Layer w5: J1.A33@-177.17,-2145.67 -108.27,-2145.67 -88.58,-2165.35 v1(98.43,-2165.35)
OT_IOB0: J1.A18 U1.AP8 | length 2659.3
  Top Layer w5: v1(0,-1601.77) 120.78,-1601.77 130.28,-1592.27 1755.29,-1592.27 2165.35,-2002.33 U1.AP8@2165.35,-2125.98
  Bottom Layer w5: J1.A18@-177.17,-1555.12 -60.91,-1555.12 -17.89,-1598.13 -3.64,-1598.13 v1(0,-1601.77)
OT_IOB1: J1.B18 U1.AN8 | length 2715.4
  Top Layer w5: J1.B18@-177.17,-1555.12 -66.45,-1555.12 -39.3,-1582.27 1759.43,-1582.27 2185.04,-2007.87 2185.04,-2145.67 U1.AN8@2165.35,-2165.35
OT_IOB2: J1.A19 U1.AP9 | length 2638.4
  Top Layer w5: v1(-31.21,-1625.71) -27.58,-1629.34 -14.14,-1629.34 -12.22,-1631.27 119.56,-1631.27 136.97,-1613.86 1748.6,-1613.86 2135.8,-2001.06 2135.8,-2063.61 2125.98,-2073.42 U1.AP9@2125.98,-2125.98
  Bottom Layer w5: J1.A19@-177.17,-1594.49 -39.37,-1594.49 -31.12,-1602.74 -31.12,-1625.61 v1(-31.21,-1625.71)
OT_IOB3: J1.B19 U1.AL8 | length 2759.4
  Top Layer w5: J1.B19@-177.17,-1594.49 -34.86,-1594.49 -8.08,-1621.27 115.42,-1621.27 132.83,-1603.86 1752.74,-1603.86 2145.8,-1996.92 2145.8,-2224.54 U1.AL8@2165.35,-2244.09
OT_IOB4: J1.A20 U1.AL10 | length 2880.7
  Top Layer w5: v1(0,-1660.77) 118.35,-1660.77 145.26,-1633.86 1740.31,-1633.86 2106.3,-1999.84 v1(2106.3,-2027.56) ; U1.AL10@2086.61,-2244.09 v1(2106.3,-2224.41)
  Bottom Layer w5: J1.A20@-177.17,-1633.86 -60.91,-1633.86 -34,-1660.77 v1(0,-1660.77) ; v1(2106.3,-2224.41) 2086.8,-2243.91 2086.8,-2272.18 2097.9,-2283.28 2116.46,-2283.28 2126.17,-2273.57 2126.17,-2255.7 2137.89,-2243.98 2137.89,-2059.15 v1(2106.3,-2027.56)
OT_IOB5: J1.B20 U1.AN9 | length 2649.4
  Top Layer w5: J1.B20@-177.17,-1633.86 -62,-1633.86 -50.65,-1645.21 -12.02,-1645.21 -8.08,-1641.27 123.7,-1641.27 141.11,-1623.86 1744.46,-1623.86 2125.8,-2005.2 2125.8,-2059.47 2108.05,-2077.21 2108.05,-2147.42 U1.AN9@2125.98,-2165.35
OT_IOB6: J1.A21 U1.AM10 | length 2641.3
  Top Layer w5: v1(-21.26,-1694.63) -19.54,-1692.91 114.48,-1692.91 153.54,-1653.86 1732.03,-1653.86 2076.74,-1998.57 2076.74,-2050.88 2068.68,-2058.94 2068.68,-2186.79 U1.AM10@2086.61,-2204.72
  Bottom Layer w5: J1.A21@-177.17,-1673.23 -39.37,-1673.23 -21.26,-1691.33 v1(-21.26,-1694.63)
OT_IOB7: J1.B21 U1.AP10 | length 2558.7
  Top Layer w5: J1.B21@-177.17,-1673.23 -15.12,-1673.23 -8.08,-1680.27 112.99,-1680.27 149.4,-1643.86 1736.17,-1643.86 2086.74,-1994.43 2086.74,-2055.02 2086.61,-2055.15 U1.AP10@2086.61,-2125.98
OT_IOB8: J1.A22 U1.AL9 | length 2727.4
  Top Layer w5: v1(0,-1732.28) 103.4,-1732.28 161.82,-1673.86 1723.74,-1673.86 2036.28,-1986.4 2036.28,-1994.69 2045.78,-2004.19 v1(2045.78,-2009.33) ; v1(2106.3,-2263.78) U1.AL9@2125.98,-2244.09
  Bottom Layer w5: J1.A22@-177.17,-1712.6 -60.91,-1712.6 -41.22,-1732.28 v1(0,-1732.28) ; v1(2045.78,-2009.33) 2045.78,-2063.38 2127.89,-2145.48 2127.89,-2239.84 2106.3,-2261.43 v1(2106.3,-2263.78)
OT_IOB9: J1.B22 U1.AP11 | length 2537.1
  Top Layer w5: J1.B22@-177.17,-1712.6 -55.85,-1712.6 -54.32,-1714.13 -9.43,-1714.13 -7.89,-1712.6 108.94,-1712.6 157.68,-1663.86 1727.89,-1663.86 2066.74,-2002.72 2066.74,-2046.73 2047.24,-2066.23 U1.AP11@2047.24,-2125.98
OT_IOB10: J1.A23 U1.AM12 | length 2583
  Top Layer w5: v1(-19.69,-1771.65) 92.31,-1771.65 170.11,-1693.86 1715.46,-1693.86 2006.78,-1985.18 v1(2006.78,-2007.87) ; U1.AM12@2007.87,-2204.72 v1(2027.56,-2185.04)
  Bottom Layer w5: J1.A23@-177.17,-1751.97 -39.37,-1751.97 v1(-19.69,-1771.65) ; v1(2006.78,-2007.87) 2029.65,-2030.74 2029.65,-2182.95 v1(2027.56,-2185.04)
OT_IOB11: J1.B23 U1.AN11 | length 2542.2
  Top Layer w5: J1.B23@-177.17,-1751.97 97.86,-1751.97 165.97,-1683.86 1719.6,-1683.86 2026.28,-1990.54 2026.28,-2017.41 2027.56,-2018.68 2027.56,-2145.67 U1.AN11@2047.24,-2165.35
OT_IOB12: J1.A24 U1.AN12 | length 2525.4
  Top Layer w5: v1(0,-1811.02) 67.08,-1811.02 174.25,-1703.86 1711.32,-1703.86 1978.5,-1971.04 1978.5,-2007.17 1988.19,-2016.86 1988.19,-2145.67 U1.AN12@2007.87,-2165.35
  Bottom Layer w5: J1.A24@-177.17,-1791.34 -19.69,-1791.34 v1(0,-1811.02)
OT_IOC0: J1.A50 U1.T24 | length 2078.4
  Top Layer w5: v1(59.06,-2814.96) 130.04,-2814.96 410,-2535 924.29,-2535 968.03,-2578.74 1314.96,-2578.74 1318.9,-2582.68 1318.9,-2688.89 1326.86,-2696.85 1353.35,-2696.85 1358.76,-2702.26 1358.76,-2730.79 1364.17,-2736.21 1436.25,-2736.21 1437.14,-2737.1 1437.14,-2772.53 1440.07,-2775.46 1515.52,-2775.46 1515.52,-2819.85 1520.19,-2824.53 1521.02,-2824.53 1531.14,-2834.65 U1.T24@1535.43,-2834.65
  Bottom Layer w5: J1.A50@-177.17,-2814.96 v1(59.06,-2814.96)
OT_IOC1: J1.B50 U1.T25 | length 1951.7
  Top Layer w5: J1.B50@-177.17,-2814.96 -70.04,-2814.96 -50.54,-2834.46 131.4,-2834.46 391.85,-2574 892.88,-2574 959.63,-2640.75 1100.03,-2640.75 1116.76,-2657.48 1271.68,-2657.48 1280.2,-2666 1280.2,-2689.4 1288.21,-2697.42 1306.67,-2697.42 1318.9,-2709.65 1318.9,-2730.31 1324.67,-2736.09 1348.3,-2736.09 1358.27,-2746.06 1358.27,-2769.71 1364.15,-2775.59 1397.64,-2775.59 1397.64,-2800.95 1411.65,-2814.96 1476.38,-2814.96 U1.T25@1496.06,-2834.65
OT_IOC2: J1.A51 U1.R27 | length 2005.2
  Top Layer w5: v1(59.06,-2854.33) 129.1,-2854.33 398.43,-2585 815.71,-2585 826.55,-2595.84 v1(831.69,-2595.84) ; v1(1397.64,-2893.7) U1.R27@1417.32,-2874.02
  Layer 4 (sig) w5: v1(831.69,-2595.84) 834.46,-2598.61 1353.51,-2598.61 1417.14,-2662.24 1417.14,-2874.2 v1(1397.64,-2893.7)
  Bottom Layer w5: J1.A51@-177.17,-2854.33 v1(59.06,-2854.33)